# EAGLE board soic8_decoupled (EAGLE 9.6.2)
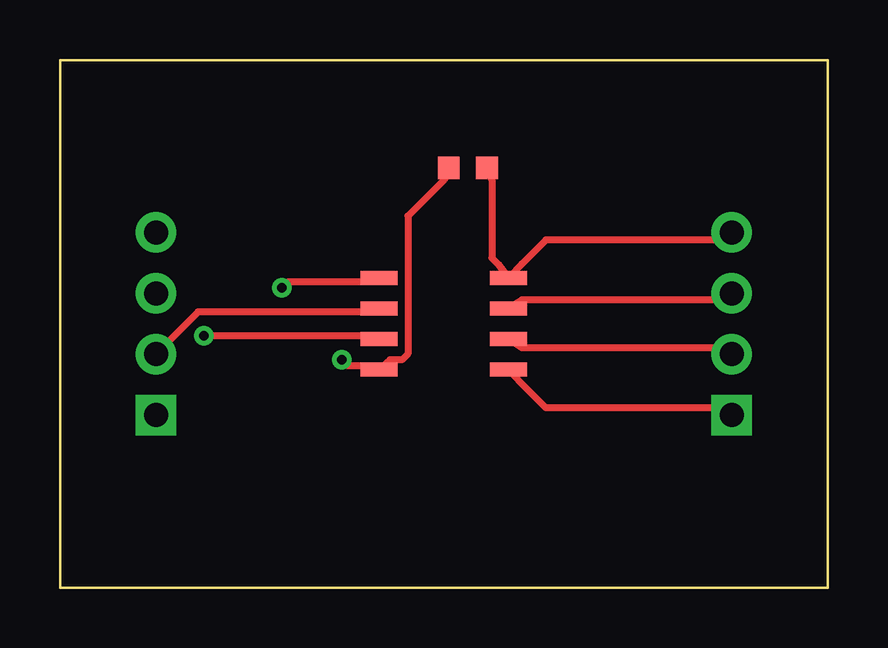
[diagram p0: board, top side]
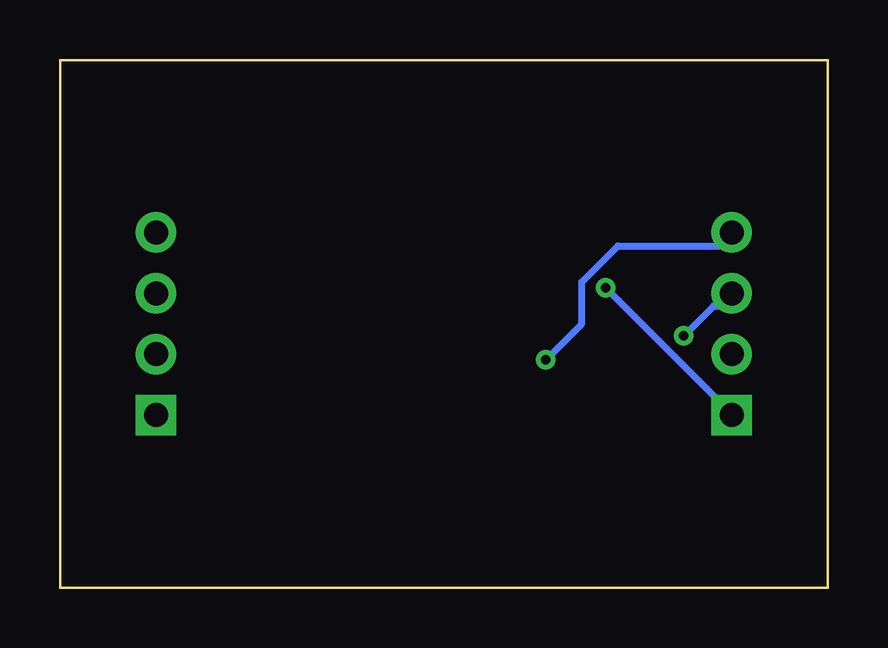
[diagram p1: board, bottom side, seen from below]

Size 32 x 22 mm. Coordinates in mm from the lower left corner, seen from the top.
Outline: 0,0 32,0 32,22 0,22 0,0
Copper layers used: Top, Bottom
Design rules "eh3d-kit": minimum track width 0.15mm, minimum drill 0.3mm, track to track 0.15mm, track to pad 0.15mm, pad to pad 0.15mm, via to via 0.15mm, smd to smd 0.15mm, copper to edge 0.3mm, drill to drill 0.25mm, minimum pad ring 0.15mm, minimum via ring 0.15mm

## Footprints (pad centres in the part's own frame; a part is rotated, then mirrored left to right if it is on the bottom)
CHIP-0603 = smd 0.9 x 0.95: 1 -0.8,0; 2 0.8,0
HDR-1X04 = drill 1 pad 1.7 square: 1 -3.81,0 | drill 1 pad 1.7: 2 -1.27,0; 3 1.27,0; 4 3.81,0
SOIC-8 = smd 1.55 x 0.6: 1 -2.7,1.905; 2 -2.7,0.635; 3 -2.7,-0.635; 4 -2.7,-1.905; 5 2.7,-1.905; 6 2.7,-0.635; 7 2.7,0.635; 8 2.7,1.905

## Placement (x,y rotation side)
C1  100n  [CHIP-0603]  17,17.5 0 top
J1  LEFT  [HDR-1X04]  4,11 90 top
J2  RIGHT  [HDR-1X04]  28,11 90 top
U1  GENERIC8  [SOIC-8]  16,11 0 top

## Library data of the parts
C1 J1 J2 U1 = eh3d-kit

## Nets
GND: C1.1 J1.4 U1.4
S1: J1.1 U1.1
S2: J1.2 U1.2
S3: J1.3 U1.3
S5: J2.1 U1.5
S6: J2.2 U1.6
S7: J2.3 U1.7
VCC: C1.2 J2.4 U1.8

## Tracks (layer width: path | path; a pad name or v marks a point on that pad's centre or on a via)
GND  (via drill 0.4 pad 0.8)
  Top 0.3: v11.75,9.5 12,9.25 12.75,9.25 U1.4 13.75,9.5 14.25,9.5 14.5,9.75 14.5,15.5 16,17 C1.1
  Bottom 0.3: v11.75,9.5 10.25,11 10.25,12.75 8.75,14.25 4.5,14.25 J1.4
S1  (via drill 0.4 pad 0.8)
  Top 0.3: U1.1 12.75,12.75 9.5,12.75 v9.25,12.5
  Bottom 0.3: v9.25,12.5 4.5,7.75 J1.1
S2
  Top 0.3: U1.2 12.75,11.5 5.75,11.5 4.5,10.25 J1.2
S3  (via drill 0.4 pad 0.8)
  Top 0.3: U1.3 12.75,10.5 v6,10.5
  Bottom 0.3: v6,10.5 4.75,11.75 4.5,11.75 J1.3
S5
  Top 0.3: J2.1 27.5,7.5 20.25,7.5 19.25,8.5 U1.5
S6
  Top 0.3: J2.2 27.5,10 19.25,10 U1.6
S7
  Top 0.3: J2.3 27.5,12 19.25,12 U1.7
VCC
  Top 0.3: C1.2 18,17 18,13.75 18.25,13.5 U1.8 19.25,13.5 20.25,14.5 27.5,14.5 J2.4